# Altium PCB Bananna board.PcbDoc
Units mm, origin at the board's own origin, x right, y up, seen from the top; angles counter-clockwise.
Board outline 63.43 x 48.61 mm, 2 copper layers (Top, Bottom); 4 components, 4 nets, 12 pads, 1 vias.
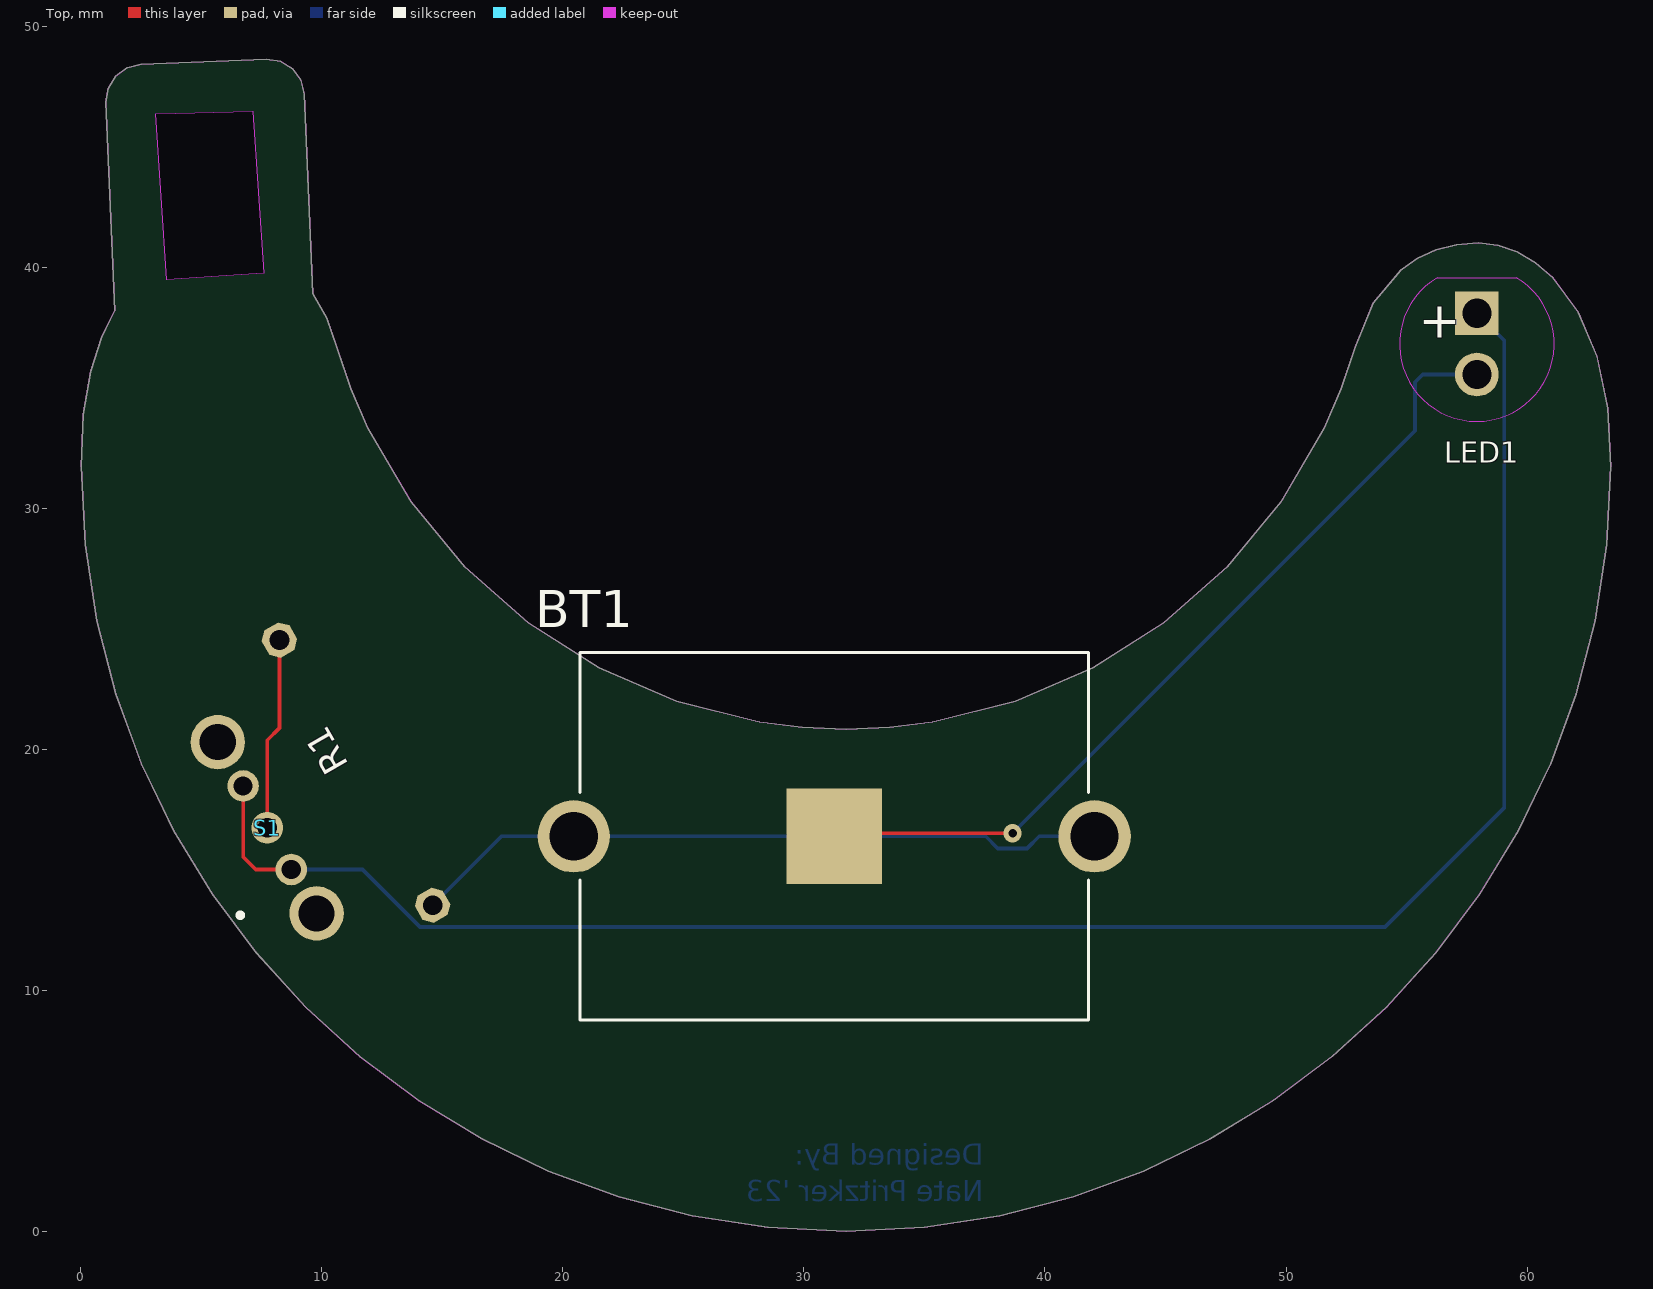
[diagram p0: Top view]
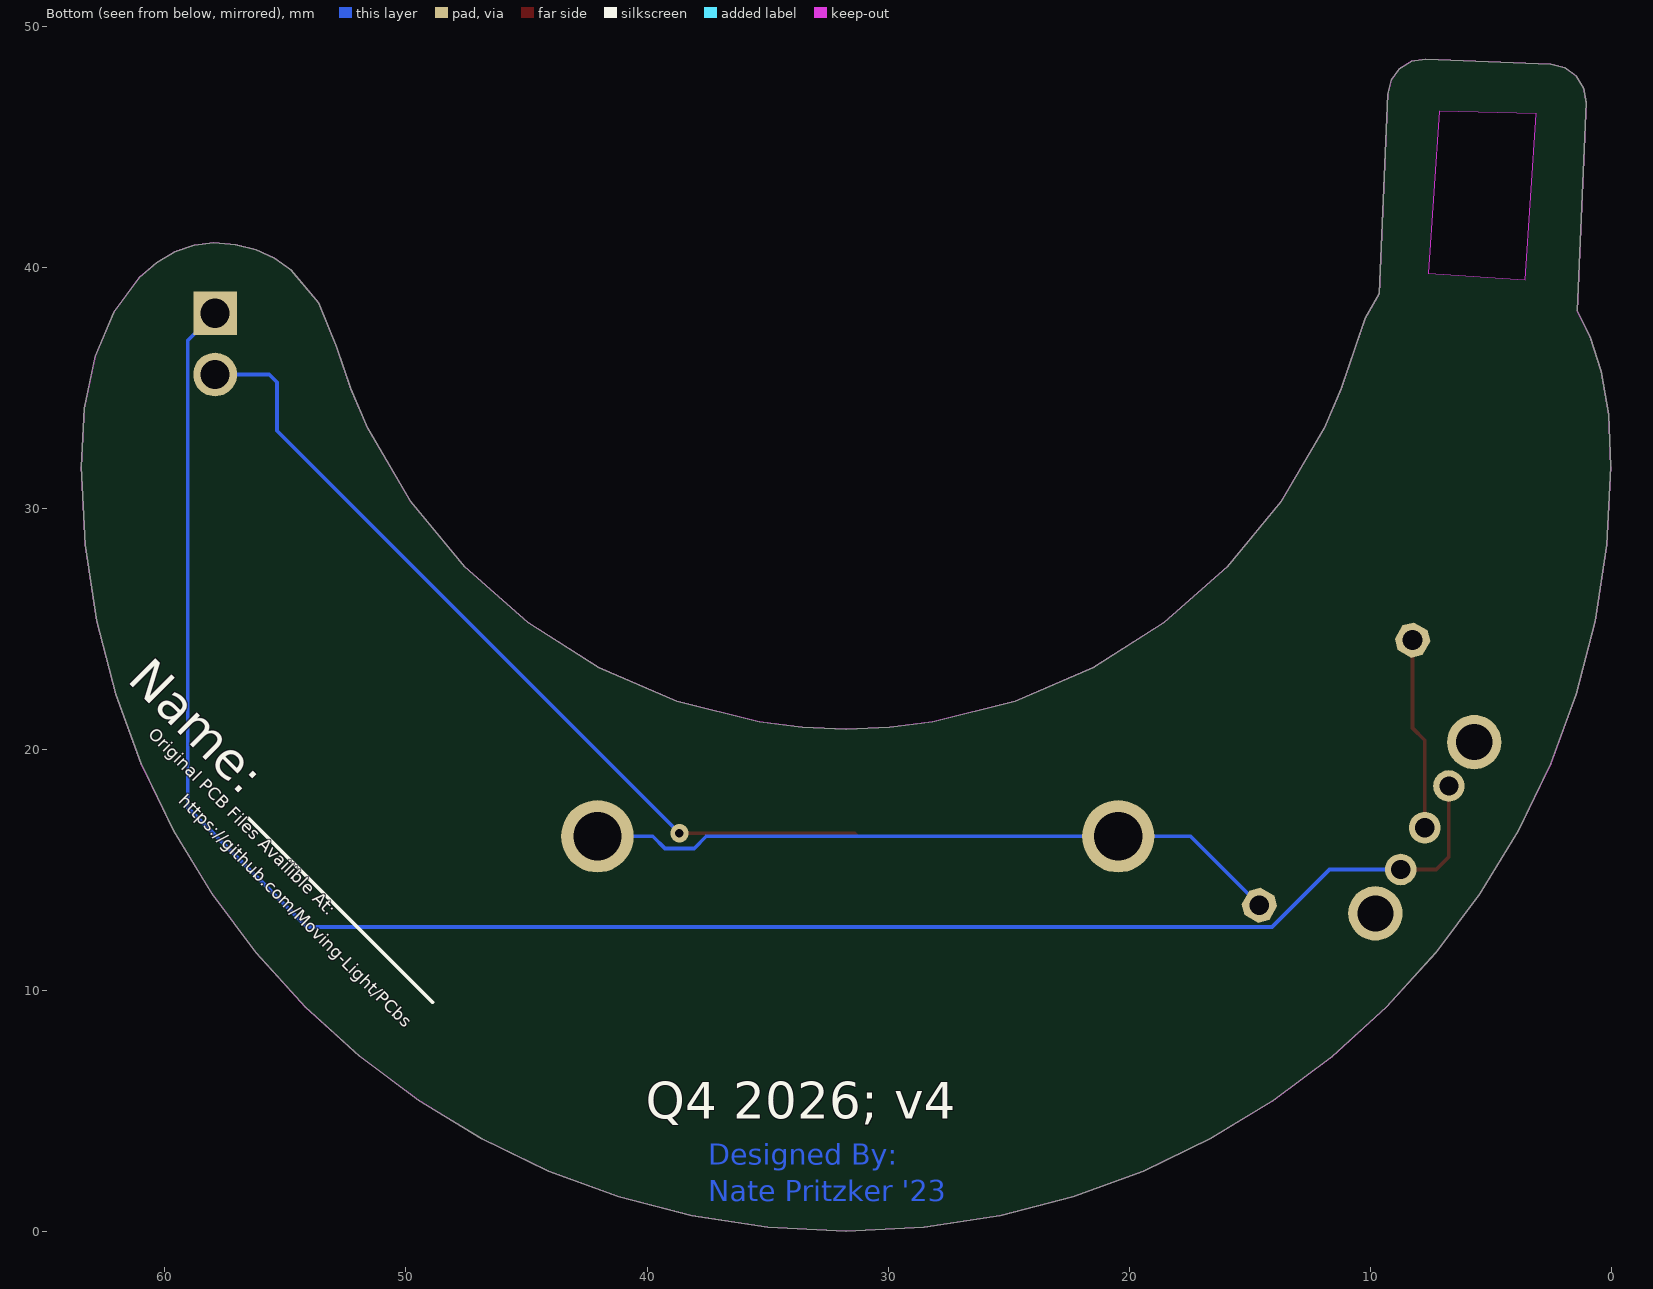
[diagram p1: Bottom view, seen from below]

## Layer stack, top to bottom
Top Solder: solder mask 0.0102, Solder Resist, Dk 3.5
Top: signal copper 0.035
Dielectric 1: dielectric 0.32, FR-4, Dk 4.8
Bottom: signal copper 0.035
Bottom Solder: solder mask 0.0102, Solder Resist, Dk 3.5

## Board outline
57.977,41.019 57.064,40.946 56.218,40.73 55.445,40.376 54.751,39.887 53.618,38.528 52.866,36.692 52.289,34.977 51.579,33.333 49.79,30.282 47.557,27.582 44.938,25.275 41.99,23.405 38.77,22.015 35.338,21.15 33.56,20.927 31.75,20.851 29.94,20.927 28.162,21.15 24.73,22.015 21.511,23.405 18.563,25.275 15.943,27.581 13.71,30.282 11.921,33.333 11.212,34.977 10.634,36.691 10.211,37.898 9.634,38.92 9.292,47.182 9.148,47.767 8.803,48.237 8.307,48.542 7.711,48.637 2.517,48.425 1.94,48.286 1.461,47.936 1.152,47.43 1.06,46.844 1.415,38.206 0.886,37.111 0.43,35.687 0.121,33.903 0.033,31.732 0.198,28.495 0.681,25.351 1.465,22.315 2.533,19.404 3.871,16.633 5.462,14.019 7.29,11.578 9.338,9.325 11.591,7.278 14.034,5.451 16.648,3.861 19.419,2.525 22.331,1.457 25.368,0.674 28.513,0.193 31.75,0.029 34.988,0.193 38.134,0.675 41.171,1.457 44.084,2.526 46.856,3.863 49.471,5.453 51.913,7.281 54.167,9.33 56.214,11.582 58.041,14.023 59.631,16.637 60.968,19.407 62.036,22.318 62.82,25.353 63.302,28.497 63.467,31.733 63.347,34.164 62.895,36.315 62.125,38.139 61.052,39.587 60.341,40.201 59.58,40.65 58.785,40.925
cut-out: 3.574,39.494 3.116,46.383 7.152,46.485 7.602,39.768

## Design rules (kind name [scope] priority, off if disabled: settings)
BoardOutlineClearance mdCopperDimension [All] p1: gap=0.254 ignorepadtopadclearanceinfootprint=FALSE except(0: Arc-SplitContinuation Track-SplitContinuation SMDPad-SplitContinuation THPad-SplitContinuation Via-SplitContinuation Fill-SplitContinuation Poly-SplitContinuation Region-SplitContinuation Text-SplitContinuation; 1.016: Poly-OutlineEdge Poly-CavityEdge Poly-CutoutEdge Poly-SplitBarrior)
Clearance "Clearance (Same Net)" [All] p1: gap=0.152 ignorepadtopadclearanceinfootprint=FALSE
Clearance [All] p2: gap=0.152 ignorepadtopadclearanceinfootprint=FALSE
HoleSize [All] p1: absolutevalues=TRUE maxlimit=2540 minlimit=0.35 maxpercent=80.000 minpercent=20.000
HoleToHoleClearance mdDrill [All] p1: gap=0.152 allowstackedmicrovias=TRUE
MinimumSolderMaskSliver [All] p1 off: minsoldermaskwidth=0.254
PasteMaskExpansion Expansion_SMDPaste_OFF [InPadClass('SMDPaste_OFF')] p1: expansion=0
PasteMaskExpansion mlMinCreamFrame [All] p2: expansion=0
PolygonConnect ThermalVias [IsVia] p1: connectstyle=Direct reliefconductorwidth=0.254 reliefentries=4 polygonreliefangle="90 Angle" airgapwidth=0.254
PolygonConnect [All] p2: connectstyle=Relief reliefconductorwidth=0.254 reliefentries=4 polygonreliefangle="90 Angle" airgapwidth=0.254
RoutingVias [All] p1: holewidth=0.35 width=0.756 viastyle="Through Hole" minholewidth=0.35 minwidth=0.756 maxholewidth=2.54 maxwidth=2.54
SolderMaskExpansion mlMinStopFrame [All] p1: expansion=0.102 istentingtop=FALSE
Width [All] p1: maxlimit=0.254 minlimit=0.152 preferedwidth=0.152
26 further rules are at their usual default settings.

## Components (designator, comment, footprint, x,y, rotation, side; value= is the part's Value field where it differs from the comment)
BT1 "BK-913" BAT_BK-913 31.26,16.407 r0 top
LED1 "L08R5000Q1" LEDRD254W57D500H1070 57.912,36.83 r270 top
R1 "" 0207/12 11.43,19.05 r120 top
S1 "" OS102011MA1QN1 7.747,16.764 r120 top

## Footprints (in the part's own frame and the unit in brackets; to place one, negate y for a bottom-side part, rotate by r counter-clockwise, add the part's x,y. Pads: shape width x height; smd on the part's side, far side on the other; paste and mask are expansions set on the pad)
0207/12 [mil] "0207/12"
  oct 52x52 / inner round 48.04 / far side oct 52x52 hole 32: 1(-250,0) 2(250,0)
  body extent -274,-24 274,24, height 150
BAT_BK-913 [mm]
  rect 3.96x3.96 smd paste-3: NEG(0,0)
  round 3 hole 2: S+1(-10.8,0) S+2(10.8,0)
  silkscreen extent -10.54,-7.62 10.54,7.62, body extent -11.15,-7.62 11.15,7.67, height 4.27
LEDRD254W57D500H1070 [mm] "LEDRD254W57D500H1070"
  round 1.815 hole 1.21: A(1.27,0)
  rect 1.815x1.815 / inner round 1.677 / far side rect 1.815x1.815 hole 1.21: C(-1.27,0)
  Top keep-out lines w0.05: -2.75,-1.64 ccw(c0.007,0) -2.75,1.64 -2.75,-1.64
  body extent -3.4,-3.24 3.25,3.24, height 3.81
OS102011MA1QN1 [mil] "OS102011MA1QN1"
  round 51.5 hole 31.5: 1(-78.74,0) 2(0,0) 3(78.74,0)
  round 88.58 hole 59.06: 4(-161.42,0) 5(161.42,0)
  silkscreen extent -106,106 -98,113, body extent -206,-91 206,91, height 150

## Part data
BT1: "Battery Retainer Coin, 20.0mm 1 Cell PC Pin", Package="Non-Standard MPD", Check_prices=https://www.snapeda.com/parts/BK-913/Memory+Protection+Devices/view-part/?ref=eda, MF=MPD, MP=BK-913, SnapEDA_Link=https://www.snapeda.com/parts/BK-913/Memory+Protection+Devices/view-part/?ref=snap
LED1: "LED, Orange, Through Hole, T-1 3/4 (5mm), 30 mA, 2.1 V, 635 nm  Check availability", Package=None, AVAILABILITY="In Stock", DeviceSetName=L08R5000Q1, GateName_1=G$1, LibraryName=L08R5000Q1, MF="LED Technology", MP=L08R5000Q1, PRICE=None, SymbolName_1=L08R5000Q1
R1: library part R-US_0207/12, "RESISTOR, American symbol", DeviceName=0207/12, DeviceSetName=R-US_, GateName_1=G$1, LibraryName=resistor, SymbolName_1=R-US
S1: library part OS102011MA1QN1, "Switch Slide Right Angle SPDT 0.1A 12VDC Through Hole Slide Switch SPDT On-On 0.1 A@ 12 V dc Slide   Source:  Datasheet", Manufacturer_Name="C & K COMPONENTS", DeviceSetName=OS102011MA1QN1, GateName_1=G$1, Height=mm, LibraryName=OS102011MA1QN1, Manufacturer_Part_Number=OS102011MA1QN1, MOUSER_PART_NUMBER=611-OS102011MA1QN1, MOUSER_PRICE-STOCK=https://www.mouser.co.uk/ProductDetail/CK/OS102011MA1QN1?qs=WtljUlYws5R6MUgHcLkz4w%3D%3D, SymbolName_1=OS102011MA1QN1

## Via types
v1: diameter 0.756, hole 0.35, Top to Bottom, 1 vias

## Nets (pads, with @x,y where several pads share a name; then routed paths per layer and width w, separated by ;. In a path a pad name is that pad's centre, name@x,y a point inside that pad or via, vN(x,y) a via of type N, cw(c..) or ccw(c..) an arc to the next point about the centre after c; other vN are vias at no path point)
NetBT1_NEG: BT1.NEG LED1.A | length 35.8
  Top w0.152: BT1.NEG 31.388,16.535 v1(38.659,16.535)
  Bottom w0.152: v1(38.659,16.535) 55.347,33.223 55.347,35.242 55.664,35.56 LED1.A
NetBT1_S+1: BT1.S+1 BT1.S+2 R1.1 | length 29.1
  Bottom w0.152: R1.1 17.461,16.407 BT1.S+1 37.544,16.407 38.046,15.905 39.26,15.905 39.762,16.407 BT1.S+2
NetLED1_C: LED1.C S1.1 S1.3 | length 79.5
  Top w0.152: S1.3 6.747,15.557 7.273,15.032 S1.1
  Bottom w0.152: S1.1 11.702,15.032 14.084,12.649 54.102,12.649 59.055,17.602 59.055,36.957 LED1.C
NetR1_2: R1.2 S1.2 | length 8
  Top w0.152: S1.2 7.747,20.396 8.255,20.904 R1.2
pads on no net: S1.4 S1.5

## Keep-outs
Keep-Out Layer:
  the board outline again, w0.001

## Other copper
Bottom:
  text "Designed By:" at 37.465,2.794 h0.86
  text "Nate Pritzker '23" at 37.465,1.27 h0.86

## Silkscreen, mask and mechanical layers (free items; w line width, h text height)
Top Overlay:
  text "+" at 55.499,37.084 h1.51
Bottom Overlay:
  lines w0.152: 48.895,9.525 56.515,17.145
  text "Name:" at 61.595,22.86 h1.51 r45
  text "Original PCB Files Availible At:" at 60.728,20.603 h0.52 r45
  text "https://github.com/Moving-Light/PCbs" at 59.461,17.849 h0.52 r45
  text "Q4 2026; v4" at 40.06,4.698 h1.51
Dimension:
  lines w0.001: 0.033,31.732 0.198,28.495 0.681,25.351 1.465,22.315 2.533,19.404 3.871,16.633 5.462,14.019 7.29,11.578 9.338,9.325 11.591,7.278 14.034,5.451 16.648,3.861 19.419,2.525 22.331,1.457 25.368,0.674 28.513,0.193 31.75,0.029 34.988,0.193 38.134,0.675 41.171,1.457 44.084,2.526 46.856,3.863 49.471,5.453 51.913,7.281 54.167,9.33 56.214,11.582 58.041,14.023 59.631,16.637 60.968,19.407 62.036,22.318 62.82,25.353 63.302,28.497 63.467,31.733 63.347,34.164 62.895,36.315 62.125,38.139 61.052,39.587 60.341,40.201 59.58,40.65 58.785,40.925 57.977,41.019 57.064,40.946 56.218,40.73 55.445,40.376 54.751,39.887 53.618,38.528 52.866,36.692 52.289,34.977 51.579,33.333 49.79,30.282 47.557,27.582 44.938,25.275 41.99,23.405 38.77,22.015 35.338,21.15 33.56,20.927 31.75,20.851 29.94,20.927 28.162,21.15 24.73,22.015 21.511,23.405 18.563,25.275 15.943,27.581 13.71,30.282 11.921,33.333 11.212,34.977 10.634,36.691 10.211,37.898 9.634,38.92 9.292,47.182 9.148,47.767 8.803,48.237 8.307,48.542 7.711,48.637 2.517,48.425 1.94,48.286 1.461,47.936 1.152,47.43 1.06,46.844 1.415,38.206 0.886,37.111 0.43,35.687 0.121,33.903 0.033,31.732 ; 3.116,46.383 3.574,39.494 7.602,39.768 7.152,46.485 3.116,46.383
Unrouted:
  lines w0: 6.747,18.496 8.747,15.032 ; 7.747,16.764 8.255,24.549